# Altium PCB Main.PcbDoc (part 2 of 2)
Units mm, origin at the board's own origin, x right, y up, seen from the top; angles counter-clockwise.
Board outline 40.1 x 80 mm, 2 copper layers (Top Layer, Bottom Layer), stack 1.569 mm thick; 84 components, 82 nets, 339 pads, 242 vias.
Unrouted connection lines stored in the file: 3.
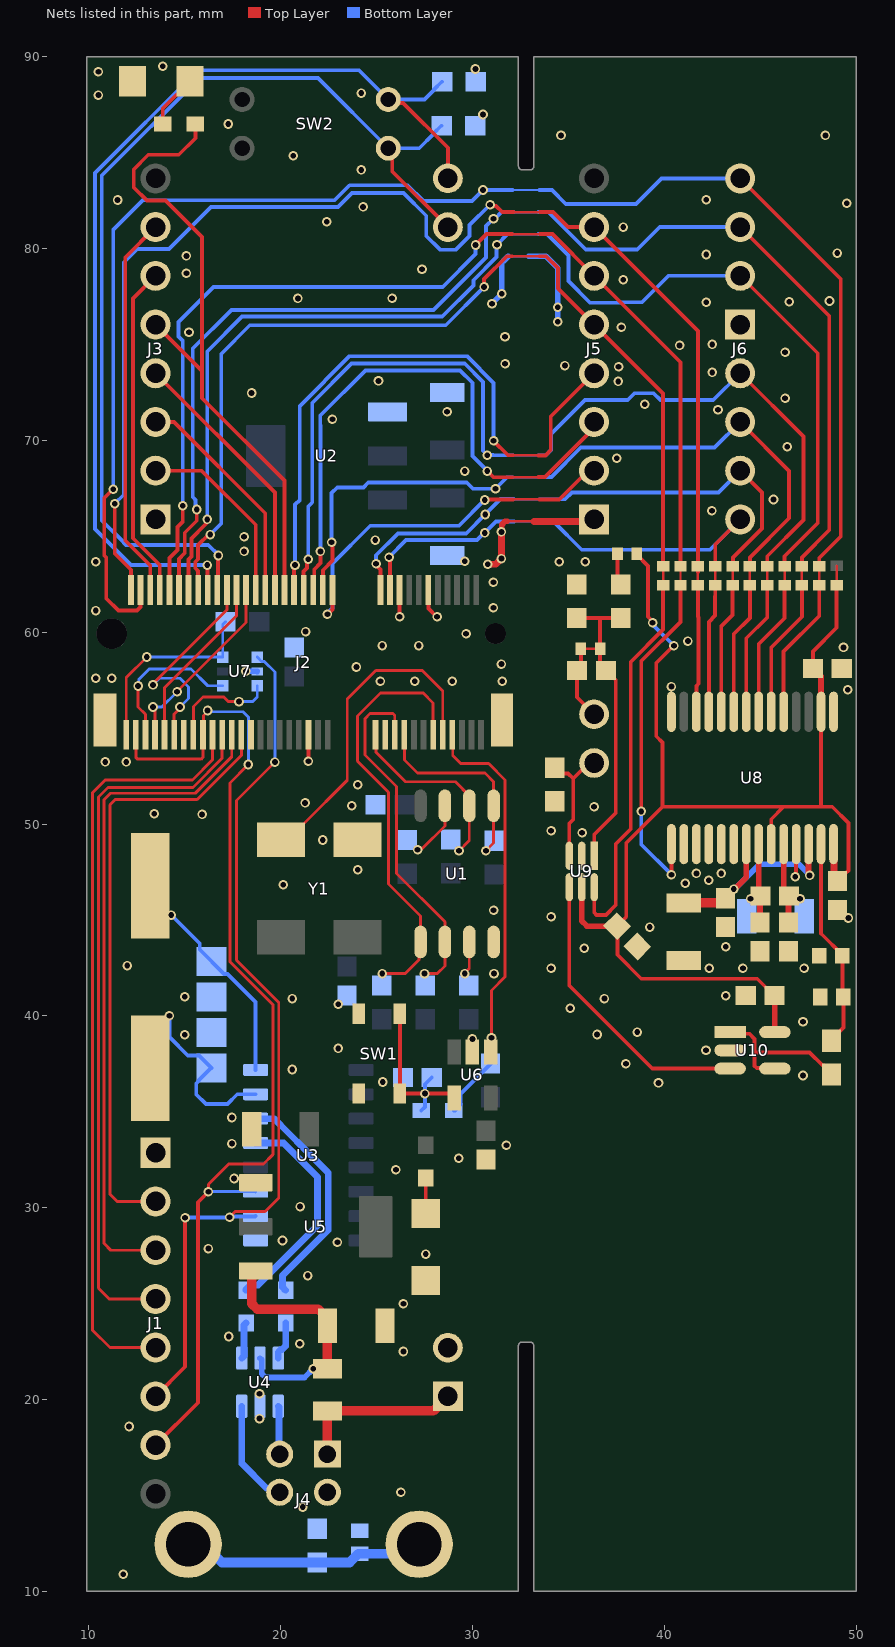
[diagram p2: the nets of this part, all layers, seen from the top]

## Via types
v1: diameter 0.5, hole 0.3, Top Layer to Bottom Layer, 242 vias

## Nets (pads, with @x,y where several pads share a name; then routed paths per layer and width w, separated by ;. In a path a pad name is that pad's centre, name@x,y a point inside that pad or via, vN(x,y) a via of type N, cw(c..) or ccw(c..) an arc to the next point about the centre after c; other vN are vias at no path point) (continued)
+3.3V_ADC: C16.2 C20.2 C21.1 C23.2 J11.2 J20.2 U8.2 U8.23 U8.28 U9.5 U10.5 | length 67.1
  Top Layer w0.2: J11.2@38.563,64.099 38.563,64.049 39.161,63.452 39.161,60.803 39.393,60.571 v1(39.393,60.49) ; v1(40.502,59.292) 40.473,59.292 39.582,58.401 39.582,54.575 39.9,54.257 39.9,50.9 ; U8.23@45.575,48.95 45.575,50.25 46.225,50.9 ; C23.2@45.752,41.054 45.727,41.054 44.846,41.935 44.33,41.935 44.328,41.933 42.123,41.933 42.121,41.935 38.8,41.935 37.554,43.182 37.554,44.658 C21.1@37.536,44.675 37.536,44.68 38.016,45.161 38.016,49.016 39.9,50.9 ; C20.2@47.75,58.1 47.75,58.994 48.985,60.229 J20.2@48.985,62.458 ; U8.2@48.175,55.85 48.175,50.9 ; C16.2@49.04,47.021 49.04,47.046 49.44,47.446 49.465,47.446 49.6,47.581 49.6,50.057 48.757,50.9 48.175,50.9 ; 39.9,50.9 46.225,50.9 ; 46.225,50.9 48.175,50.9
  Top Layer w0.3: U9.5@35.7,46.705 35.7,44.94 35.965,44.675 C21.1@36.935,44.675 ; C23.2@45.752,41.054 45.766,41.04 U10.5@45.766,39.15 ; C20.2@47.775,58.1 48.175,57.7 U8.2@48.175,55.85
  Top Layer w0.35: U8.28@48.825,48.95 48.844,48.931 48.844,47.217 C16.2@49.04,47.021
  Bottom Layer w0.2: v1(39.393,60.49) 39.393,60.409 39.733,60.069 39.733,60.062 40.502,59.293 v1(40.502,59.292)
+5V: C9.2 F1.2 U4.5 U5.3 | length 12.4
  Top Layer w0.5: U5.3@18.489,26.71 18.489,24.993 18.782,24.7 21.97,24.7 22.437,24.233 F1.2@22.437,21.604
  Bottom Layer w0.3: U4.5@18.928,22.153 19.012,22.069 19.012,21.343 19.211,21.144 21.244,21.144 v1(21.7,21.6)
+5V_USB: F1.1 J4.1 P2.1 | length 8.9
  Top Layer w0.5: J4.1@22.44,17.15 22.44,19.401 F1.1@22.437,19.404 27.964,19.404 P2.1@28.72,20.16
A: U9.4 U10.3 | length 15.3
  Top Layer w0.2: U9.4@35.05,46.705 35.05,41.576 39.376,37.25 U10.3@43.434,37.25
AIN: C24.1 R19.2 R20.2 U8.27 | length 11
  Top Layer w0.2: U8.27@48.175,48.95 48.175,44.275 48.182,44.275 49.288,43.169 R20.2@49.288,43.142 49.288,41.037 C24.1@49.339,40.985 49.339,39.392 48.718,38.771 R19.2@48.718,38.699
ANA_0: P3.1 R21.2 U9.3 | length 6.7
  Top Layer w0.2: R21.2@34.295,52.939 34.598,52.636 34.983,52.636 35.255,52.365 ; U9.3@35.05,48.345 35.05,50.028 35.255,50.233 35.255,52.365 ; P3.1@36.339,53.18 36.07,53.18 35.255,52.365
ANA_1: C22.2 J12.2 P3.2 | length 3.9
  Top Layer w0.2: J12.2@35.657,59.129 35.657,58.203 C22.2@35.454,58 35.454,56.605 P3.2@36.339,55.72
CH340_RX: J1.7 J2.59 J2.73 U3.3 | length 54.9
  Top Layer w0.15: J2.59@15.986,54.686 15.986,55.654 16.191,55.859 v1(16.191,55.917) ; v1(18.316,53.1) 17.36,52.144 17.36,42.816 19.6,40.576 19.6,39.01 19.595,39.005
  Top Layer w0.16: J2.73@12.45,54.65 12.45,53.477 12.544,53.383 15.856,53.383 15.95,53.477 J2.59@15.95,54.65 ; v1(16.234,30.827) 16.234,31.211 17.295,32.271 19.104,32.271 19.595,32.762 19.595,39.005
  Top Layer w0.2: J1.7@13.48,17.62 15.684,19.825 15.684,30.277 v1(16.234,30.827) ; J2.59@15.95,54.65 J2.59@15.986,54.686
  Bottom Layer w0.15: v1(16.191,55.917) 16.253,55.855 18.035,55.855 18.316,55.574 v1(18.316,53.1)
  Bottom Layer w0.16: v1(16.234,30.827) 16.257,30.85 18.673,30.85 U3.3@18.696,30.827
CH340_TX: J1.6 U3.2 U7.1 | length 47
  Top Layer w0.15: v1(17.34,29.501) 17.633,29.794 19.194,29.794 19.9,30.5 19.9,40.7 17.7,42.9 17.7,51.23 v1(19.7,53.23)
  Top Layer w0.2: J1.6@13.48,20.16 15.021,21.701 v1@15.021,29.469
  Bottom Layer w0.15: U7.1@18.783,58.705 19.008,58.48 19.147,58.48 19.705,57.922 19.705,53.235 v1(19.7,53.23)
  Bottom Layer w0.2: v1(15.02,29.47) 15.035,29.485 17.324,29.485 17.368,29.529 18.667,29.529 U3.2@18.696,29.557
CLK: J2.9 Y1.3 | length 16.4
  Top Layer w0.15: Y1.3@20.727,49.7 20.727,49.778 20.977,49.778 21.191,49.992 21.191,49.998 23.475,52.282 23.475,56.512 24.963,58 27.387,58 28.45,56.937 J2.9@28.45,54.65
CS: J1.4 J2.55 | length 37.3
  Top Layer w0.15: J1.4@13.48,25.24 11.06,25.24 10.5,25.8 10.5,51.4 11,51.9 15.424,51.9 16.95,53.426 J2.55@16.95,54.65
D2: J15.2 U8.5 | length 7.4
  Top Layer w0.2: U8.5@46.225,55.85 46.225,58.988 48.079,60.842 48.079,61.5 48.081,61.503 J15.2@48.081,62.439
D3: J7.2 U8.6 | length 7.3
  Top Layer w0.2: U8.6@45.575,55.85 45.575,59.206 47.174,60.805 47.174,62.436 J7.2@47.177,62.439
D4: J17.2 U8.7 | length 7.1
  Top Layer w0.2: U8.7@44.925,55.85 44.925,59.381 46.273,60.728 J17.2@46.273,62.439
D5: J14.2 U8.8 | length 7
  Top Layer w0.2: U8.8@44.275,55.85 44.275,59.68 45.366,60.771 45.366,62.436 J14.2@45.368,62.439
D6: J16.2 U8.9 | length 6.9
  Top Layer w0.2: U8.9@43.625,55.85 43.625,59.904 44.464,60.743 J16.2@44.464,62.439
D7: J18.2 U8.10 | length 6.8
  Top Layer w0.2: U8.10@42.975,55.85 42.975,60.322 43.557,60.904 43.557,61.818 43.56,61.82 J18.2@43.56,62.439
D8: J19.2 U8.11 | length 6.7
  Top Layer w0.2: U8.11@42.325,55.85 42.325,60.536 42.65,60.861 42.65,61.864 42.656,61.869 J19.2@42.656,62.439
D9: J8.2 U8.12 | length 6.6
  Top Layer w0.2: U8.12@41.675,55.85 41.675,57.2 41.784,57.309 41.784,60.769 41.751,60.802 J8.2@41.751,62.439
GND: C1.1 C2.1 C3.1 C4.2 C5.1 C6.1 C7.1 C8.2 C9.1 C10.2 C11.1 C12.2 C13.2 C14.1 C16.1 C18.1 C19.1 C20.1 C21.2 C23.1 C24.2 D1.1 D2.1 J1.1 J2.12 J2.18 J2.37 J2.76 J2.77 J3.8 J4.4 J5.8 J6.4 P2.2 R11.1 R16.1 R17.1 R18.1 R20.1 R21.1 SW1.1 SW1.2 U1.4 U2.1 U3.1 U4.2 U5.1 U6.2 U7.2 U8.1 U8.14 U8.16 U8.17 U8.18 U8.19 U8.20 U8.25 U9.2 U10.2 Y1.2 | length 22.7
  Top Layer w0.127: 31.82,65.782 33.202,65.782 33.209,65.775
  Top Layer w0.2: v1(21.45,53.275) J2.37@21.45,54.65 ; v1(26.2,60.811) J2.18@26.2,62.2 ; J2.12@27.7,62.2 27.7,61.238 28.131,60.807 v1(28.155,60.807) ; v1(46.825,47.246) 46.875,47.296 U8.25@46.875,48.95
  Top Layer w0.3: v1(31.51,65.228) 31.522,65.24 31.522,65.606 31.698,65.782 31.82,65.782
  Top Layer w0.35: v1(30.801,63.537) 31.209,63.537 v1(31.51,63.838) v1(31.51,65.228) ; 33.209,65.775 36.234,65.775 J5.8@36.34,65.88
  Bottom Layer w0.127: 31.866,79.601 32.929,79.601
  Bottom Layer w0.3: v1(18.19,57.97) 18.197,57.963 18.775,57.963 U7.2@18.783,57.955 ; v1(31.018,77.125) 31.018,77.13 31.521,77.633 31.521,79.249 31.659,79.387 31.659,79.395 31.866,79.601 ; 32.929,79.601 33.833,79.601 34.452,78.982 v1(34.452,76.181)
  other v1: 11.8,10.89 21.15,14.393 26.268,15.16 12.1,18.586 18.9,19 18.9,20.3 26.4,22.5 21,22.9 17.3,23.283 26.4,24.987 21.415,26.457 27.566,27.579 16.234,27.864 22.96,28.195 20.095,28.287 21.015,30.053 17.574,31.52 26.009,31.975 29.29,32.57 31.772,33.252 17.458,33.34 17.458,34.7 39.7,36.5 25.32,36.55 47.232,36.889 20.6,37.2 38,37.5 42.175,38.2 23,38.3 30,38.79 15,39.01 36.5,39.024 38.597,39.15 47.232,39.695 35.1,40.4 23,40.6 20.6,40.9 36.881,40.9 15,41 43.2,41.04 31.125,42.2 34.1,42.485 42.351,42.483 44.1,42.483 47.291,42.483 12.006,42.618 35.827,43.525 43.2,43.6 39.237,44.627 49.6,45.1 34.1,45.161 31.1,45.5 20.138,46.83 41.1,46.906 42.325,47.074 41.675,47.424 42.975,47.424 24.016,47.615 22.191,49.167 35.714,49.54 34.1,49.652 15.906,50.499 13.406,50.539 36.339,50.9 23.712,50.95 21.272,51.1 24.016,52.044 10.857,53.236 11.95,53.236 49.564,57 40.375,57.163 25.201,57.437 26.995,57.437 28.95,57.437 31.55,57.437 10.357,57.6 11.2,57.6 23.949,58.185 31.51,58.335 49.346,59.206 25.296,59.303 27.2,59.303 41.234,59.535 29.67,59.925 21.3,60.03 10.357,61.125 31.094,61.278 31.094,62.6 10.357,63.675 34.525,63.671 35.886,63.671 29.6,63.7 18.095,64.212 24.926,64.8 18.095,64.98 42.484,66.326 45.694,66.917 29.6,68.4 37.519,69.064 46.417,69.665 22.7,71.1 28.679,71.487 42.8,71.597 38.982,71.88 46.3,72.2 18.486,72.47 37.601,73.074 25.1,73.1 42.5,73.546 37.618,73.838 34.822,73.9 31.7,74 46.3,74.6 40.797,74.952 42.5,75.003 31.696,75.403 15.223,75.64 37.765,75.903 34.452,76.947 42.192,77.202 46.517,77.229 48.617,77.265 20.9,77.4 25.812,77.412 31.522,77.639 37.863,78.38 15.085,78.717 27.368,78.917 15.085,79.617 42.192,79.692 49.017,79.765 37.863,81.12 22.4,81.393 24.298,82.173 49.517,82.365 11.5,82.533 42.192,82.546 24.2,84.1 20.656,84.84 34.618,85.9 48.4,85.9 17.267,86.496 30.55,86.99 10.5,88 24.2,88.106 10.5,89.22 30.153,89.36 13.853,89.5
GO: J9.2 U8.15 | length 18.2
  Top Layer w0.2: v1(38.8,50.656) 38.8,58.495 40.838,60.533 40.838,61.857 40.847,61.866 J9.2@40.847,62.439 ; v1(40.375,47.359) U8.15@40.375,48.95
  Bottom Layer w0.2: v1(38.8,50.656) 38.8,48.934 v1(40.375,47.359)
gpio: J2.21
IO0: J2.49
IO7: J2.63
IO14: J2.74 J5.2 J8.1 | length 67.5
  Top Layer w0.127: 32.15,81.9 33.512,81.9
  Top Layer w0.2: v1(11.35,66.7) 11.35,64.104 12.2,63.254 J2.74@12.2,62.2 ; v1(30.92,82.288) 31.002,82.288 31.07,82.22 31.231,82.22 31.551,81.9 32.15,81.9 ; 33.512,81.9 34.2,81.9 34.98,81.12 J5.2@36.34,81.12 41.751,75.708 J8.1@41.751,63.439 41.751,63.123
  Bottom Layer w0.2: v1(11.35,66.7) 11.819,67.169 11.819,79.281 12.521,79.983 14.183,79.983 16.373,82.173 22.999,82.173 23.726,82.9 26.4,82.9 27.591,81.709 27.591,80.652 28.301,79.942 29.139,79.942 29.849,80.652 29.849,81.228 30.909,82.288 v1(30.92,82.288)
IO15: J2.72 J6.1 J15.1 | length 80.5
  Top Layer w0.2: v1(11.269,67.454) 10.8,66.985 10.8,64.009 10.907,63.903 10.907,61.761 11.542,61.125 12.508,61.125 12.7,61.317 J2.72@12.7,62.2 ; J6.1@43.96,83.66 49.2,78.42 49.2,64.995 48.081,63.876 J15.1@48.081,63.439
  Bottom Layer w0.127: 32.101,83.052 33.479,83.052
  Bottom Layer w0.2: v1(11.269,67.454) 11.269,80.969 12.833,82.533 12.999,82.533 13.009,82.523 22.822,82.523 23.599,83.3 26.63,83.3 27.447,82.483 29.98,82.483 v1@30.607,83.11 ; v1(30.55,83.052) 32.101,83.052 ; 33.483,83.048 34.141,83.048 34.861,82.328 38.528,82.328 39.86,83.66 J6.1@43.96,83.66
IO16: J2.70 J3.2 | length 20.1
  Top Layer w0.2: J2.70@13.2,62.2 13.2,63.478 11.9,64.778 11.9,79.54 J3.2@13.48,81.12
IO17: J2.68 J3.3 | length 17.4
  Top Layer w0.2: J3.3@13.48,78.58 12.3,77.401 12.3,64.9 13.7,63.5 J2.68@13.7,62.2
IO18: J2.66 J5.3 J9.1 | length 56.1
  Top Layer w0.127: 32.059,80.752 33.495,80.752 33.504,80.762
  Top Layer w0.2: J2.66@14.2,62.2 14.2,63.869 14.617,64.285 14.617,65.487 14.901,65.771 v1(14.901,66.598) ; v1(30.161,80.187) 30.727,80.752 32.059,80.752 ; 33.512,80.753 34.166,80.753 J5.3@36.34,78.58 40.847,74.072 J9.1@40.847,63.439
  Bottom Layer w0.2: v1(14.901,66.598) 14.901,75.184 14.673,75.412 14.673,75.868 14.676,75.87 14.676,76.176 16.499,78 28.449,78 30.161,79.712 v1(30.161,80.187)
IO19: J2.64 J6.2 J7.1 | length 67
  Top Layer w0.2: J2.64@14.7,62.2 14.7,63.821 15,64.121 15,65.185 15.627,65.812 v1(15.627,66.396) ; J6.2@43.96,81.12 48.6,76.48 48.6,65.32 47.177,63.896 J7.1@47.177,63.439
  Bottom Layer w0.127: 32.141,81.9 33.431,81.9
  Bottom Layer w0.2: v1(15.627,66.396) 15.57,66.453 15.57,66.892 15.416,67.046 15.416,74.786 17.43,76.8 27.97,76.8 30.711,79.541 30.711,81.17 v1(31.096,81.555) 31.177,81.555 31.522,81.9 32.141,81.9 ; 33.431,81.9 33.952,81.9 35.203,80.649 35.905,79.947 38.589,79.947 39.762,81.12 J6.2@43.96,81.12
IO20: J2.62 J6.3 J17.1 | length 64.1
  Top Layer w0.2: J2.62@15.2,62.2 15.2,63.796 15.35,63.946 15.35,64.887 16.071,65.608 16.12,65.657 16.12,65.823 v1(16.177,65.88) ; J6.3@43.96,78.58 48,74.54 48,65.689 46.273,63.962 J17.1@46.273,63.439
  Bottom Layer w0.127: 32.063,80.752 33.435,80.752
  Bottom Layer w0.2: v1(16.177,65.88) 16.177,74.642 17.985,76.45 28.428,76.45 30.057,78.079 30.057,78.351 31.259,79.552 31.259,80.181 v1(31.28,80.202) 31.83,80.752 32.063,80.752 ; 33.435,80.752 33.894,80.752 35,79.647 35,78.312 36.135,77.177 37.737,77.177 37.763,77.202 38.842,77.202 40.22,78.58 J6.3@43.96,78.58
IO21: J2.60 J5.4 J10.1 | length 51
  Top Layer w0.127: 32.059,79.6 33.484,79.6
  Top Layer w0.2: J2.60@15.7,62.2 15.7,63.199 15.55,63.349 15.55,63.651 15.7,63.801 15.7,64.54 16.25,65.09 v1(16.331,65.09) ; v1(30.607,78) 30.607,78.407 31.8,79.6 32.059,79.6 ; 33.484,79.6 33.836,79.6 34.452,78.984 34.452,77.927 39.943,72.437 J10.1@39.943,63.439
  Bottom Layer w0.2: v1(16.331,65.09) 16.9,65.659 16.9,74.509 18.391,76 28.607,76 v1(30.607,78)
IO27: J2.48 J3.7 | length 9.8
  Top Layer w0.2: J3.7@13.48,68.42 15.88,68.42 18.7,65.6 J2.48@18.7,62.2
IO28: J2.46 J3.6 | length 11.7
  Top Layer w0.2: J3.6@13.48,70.96 13.485,70.955 14.445,70.955 19.2,66.2 J2.46@19.2,62.2
IO29: J2.44 J3.5 | length 13.9
  Top Layer w0.2: J3.5@13.48,73.5 19.7,67.28 J2.44@19.7,62.2
IO30: J2.42 J3.4 R1.2 | length 33.8
  Top Layer w0.2: J3.4@13.48,76.04 15.9,73.619 ; R1.2@15.553,86.496 15.553,85.753 14.688,84.888 13.1,84.888 12.343,84.131 12.343,83.189 13.032,82.5 14,82.5 15.9,80.6 15.9,73.619 ; J2.42@20.2,62.2 20.2,67.9 15.9,72.2 15.9,73.619
IO31: J2.40 J5.5 | length 32.8
  Top Layer w0.127: 32.125,69.225 33.442,69.225
  Top Layer w0.2: J2.40@20.7,62.2 20.7,63.45 v1(20.75,63.5) ; v1(31.1,69.976) 31.854,69.223 32.123,69.223 ; 33.45,69.217 33.8,69.217 34.082,69.499 34.082,71.243 J5.5@36.34,73.5
  Bottom Layer w0.2: v1(20.75,63.5) 20.75,66.65 21,66.9 21,71.8 23.59,74.39 29.71,74.39 31.1,73 v1(31.1,69.976)
IO32: J2.38 J6.5 J14.1 | length 51.9
  Top Layer w0.2: J2.38@21.2,62.2 21.2,63.172 21.382,63.354 21.382,63.749 v1(21.439,63.806) ; J6.5@43.96,73.5 47.252,70.208 47.252,65.848 45.366,63.962 45.366,63.441 J14.1@45.368,63.439
  Bottom Layer w0.127: 32.112,69.225 33.428,69.225
  Bottom Layer w0.2: v1(21.439,63.806) 21.439,66.56 21.65,66.771 21.65,71.955 23.695,74 29.6,74 30.55,73.05 30.55,69.456 v1(30.777,69.229) 31.069,69.229 31.073,69.225 32.112,69.225 ; 33.428,69.225 33.825,69.225 34.1,69.5 34.1,70.328 35.869,72.097 38.097,72.097 38.455,72.455 39.442,72.455 39.8,72.097 42.557,72.097 J6.5@43.96,73.5
IO33: J2.36 J5.6 | length 30.4
  Top Layer w0.127: 32.092,68.081 33.434,68.081
  Top Layer w0.2: J2.36@21.7,62.2 21.75,62.25 21.75,63.275 22.074,63.599 v1(22.074,64.212) ; v1(30.777,68.4) 31.096,68.081 32.092,68.081 ; 33.435,68.082 33.784,68.082 36.34,70.637 J5.6@36.335,70.96
  Bottom Layer w0.2: v1(22.074,64.212) 22.074,70.774 22.062,70.787 22.062,71.29 24.422,73.65 25.072,73.65 25.528,73.65 29.353,73.65 30,73.003 30,69.177 v1(30.777,68.4)
IO34: J2.34 J6.6 J16.1 | length 37.8
  Top Layer w0.2: J2.34@22.2,62.2 22.2,63.23 22.7,63.73 22.7,64.648 v1(22.654,64.694) ; J6.6@43.96,70.96 46.509,68.411 46.509,65.944 44.464,63.899 J16.1@44.464,63.439
  Bottom Layer w0.127: 32.087,68.08 33.433,68.08 33.448,68.095 33.5,68.095
  Bottom Layer w0.2: v1(22.654,64.694) 22.654,67.254 22.949,67.549 24.317,67.549 24.568,67.8 29.703,67.8 30.029,67.475 v1(31.2,67.475) 31.806,68.08 32.087,68.08 ; 33.5,68.095 34.117,68.095 35.645,69.623 42.622,69.623 J6.6@43.96,70.96
IO35: J2.32 J5.7 | length 19.9
  Top Layer w0.127: 32.125,66.925 33.479,66.925
  Top Layer w0.2: v1(22.44,60.929) 22.447,60.929 22.703,61.185 22.703,62.197 J2.32@22.7,62.2 ; v1(30.637,66.89) 30.672,66.925 32.125,66.925 ; 33.479,66.925 34.525,66.925 36.01,68.41 J5.7@36.41,68.41
  Bottom Layer w0.2: v1(22.44,60.929) 22.44,61.01 22.696,61.266 22.696,63.574 24.672,65.55 29.298,65.55 v1(30.637,66.89)
IO36: J2.22 J6.7 J18.1 | length 28.7
  Top Layer w0.2: v1(24.978,63.57) 24.978,63.497 25.2,63.275 J2.22@25.2,62.2 ; J18.1@43.56,63.439 43.584,63.463 43.584,63.896 45.097,65.409 45.097,67.283 J6.7@43.96,68.42
  Bottom Layer w0.127: 32.165,66.932 33.48,66.932 33.483,66.929
  Bottom Layer w0.2: v1(24.978,63.57) 24.978,64.013 26.115,65.15 29.675,65.15 v1(30.661,66.136) ; v1@30.709,66.184 31.466,66.94 32.157,66.94 ; 33.483,66.929 34.829,66.929 35.183,67.283 42.823,67.283 J6.7@43.96,68.42
IO37: J2.20 J6.8 J19.1 | length 25.3
  Top Layer w0.2: v1(25.652,63.909) 25.7,63.861 J2.20@25.7,62.2 ; J19.1@42.656,63.222 42.656,63.494 42.657,63.495 42.657,64.577 J6.8@43.96,65.88
  Bottom Layer w0.127: 32.168,65.778 33.475,65.778
  Bottom Layer w0.2: v1(25.652,63.909) 26.543,64.8 30.234,64.8 30.609,65.175 v1(30.637,65.175) 30.637,65.18 31.235,65.778 32.168,65.778 ; 33.479,65.775 34.225,65.775 35.7,64.3 42.38,64.3 J6.8@43.96,65.88
NetC4_1: C4.1 J4.5 J4.6 R11.2 | length 12.8
  Bottom Layer w0.5: J4.5@15.18,12.45 15.995,12.45 16.945,11.5 23.595,11.5 24.055,11.96 26.73,11.96 J4.6@27.22,12.45
NetC8_1: C8.1 U3.7 Y2.2 | length 9.2
  Bottom Layer w0.2: v1(14.2,40) 14.2,38.887 15.158,37.929 15.75,37.929 C8.1@16.4,37.279 16.375,37.279 15.725,36.629 15.725,36.604 15.6,36.479 15.6,35.9 16.1,35.4 16.646,35.4 16.65,35.396 17.15,35.396 17.154,35.4 17.233,35.4 17.741,35.907 U3.7@18.696,35.907
NetC10_1: C10.1 U3.8 Y2.1 | length 10
  Bottom Layer w0.2: v1(14.3,45.25) 15.785,43.766 15.785,43.448 17.05,42.183 17.226,42.183 18.696,40.713 U3.8@18.696,37.177
NetC12_1: C12.1 R14.1 SW1.3 SW1.4 U6.4 | length 9
  Top Layer w0.2: SW1.3@26.215,35.945 v1(27.52,35.945) 28.825,35.945 U6.4@29.05,35.72 ; SW1.3@26.215,35.955 SW1.4@26.215,40.105
  Bottom Layer w0.2: R14.1@27.332,35.065 27.52,35.253 v1(27.52,35.945) 27.52,36.43 C12.1@27.88,36.79
NetC13_1: C13.1 C19.2 U8.21 U8.26 | length 11.4
  Top Layer w0.2: v1(43.625,46.605) C13.1@43.671,46.605
  Top Layer w0.3: C13.1@43.671,46.605 44.275,47.209 U8.21@44.275,48.95 ; U8.26@47.525,48.95 47.525,47.422 47.576,47.372 v1(47.576,47.318)
  Top Layer w0.5: C19.2@41.021,45.887 42.95,45.887 43.2,46.137 C13.1@43.2,46.18
  Bottom Layer w0.2: v1(43.625,46.605) v1@43.674,46.605
  Bottom Layer w0.3: v1@43.674,46.605 44.969,47.9 47.02,47.9 47.576,47.344 v1(47.576,47.318)
NetC14_2: C14.2 C15.2 C17.2 U8.24 | length 4.2
  Top Layer w0.3: U8.24@46.225,48.95 46.225,46.529 C17.2@46.512,46.242 46.478,46.209 C14.2@46.478,44.863
  other v1: 47.08,46.108
NetC15_1: C15.1 C17.1 C18.2 U8.22 | length 4.1
  Top Layer w0.3: U8.22@44.925,48.95 44.925,46.329 C17.1@45.012,46.242 44.99,46.22 C18.2@44.99,44.863
  other v1: 44.5,46.108
NetC22_1: C22.1 J12.1 R15.1 R18.2 U9.1 | length 15.5
  Top Layer w0.2: R18.2@35.439,60.738 36.585,60.738 ; U9.1@36.35,48.345 36.35,49.45 37.468,50.568 37.468,57.511 36.979,58 C22.1@36.954,58 36.654,58.3 36.654,59.129 36.654,60.669 36.585,60.738 ; R15.1@37.731,60.738 36.585,60.738
NetD1_2: D1.2 R1.1 | length 2.9
  Top Layer w0.2: R1.1@13.853,86.496 13.853,87.295 14.583,88.025 14.683,88.025 15.283,88.625 D1.2@15.283,88.725
NetD2_2: D2.2 R12.2 | length 1.9
  Top Layer w0.2: D2.2@27.566,29.695 R12.2@27.566,31.549
NetJ11_1: J11.1 R15.2 | length 1.7
  Top Layer w0.2: J11.1@37.563,64.099 37.563,62.658 R15.2@37.731,62.491
NetR5_2: R5.2 U1.7 | length 3
  Top Layer w0.15: v1(27.138,48.654) 27.205,48.721 27.386,48.721 28.565,49.9 U1.7@28.565,50.95
NetR6_2: R6.2 U1.3 | length 1.7
  Top Layer w0.15: v1(29.6,42.2) 29.6,42.228 29.835,42.463 U1.3@29.835,43.85
NetR9_2: R9.2 U4.6 | length 2
  Bottom Layer w0.35: U4.6@19.878,22.153 19.878,22.463 19.998,22.583 20.056,22.583 20.261,22.788 R9.2@20.261,23.987
NetR10_2: R10.2 U4.4 | length 1.9
  Bottom Layer w0.35: U4.4@17.978,22.153 18.089,22.264 18.089,23.876 R10.2@18.2,23.987
NetR19_1: R19.1 U10.1 U10.4 | length 8.5
  Top Layer w0.2: U10.1@43.434,39.15 43.52,39.064 44.436,39.064 44.702,38.798 44.702,38.095 ; U10.4@45.766,37.25 45.742,37.274 44.819,37.274 44.702,37.391 44.702,38.095 ; R19.1@48.718,36.949 48.718,37.02 48.312,37.427 48.24,37.427 47.572,38.095 44.702,38.095
P11: J2.11 R3.1 U1.1 | length 22.6
  Top Layer w0.15: v1(25.3,42.2) 26.495,42.2 27.219,42.924 27.219,43.774 U1.1@27.295,43.85 27.295,45.205 25.624,46.876 25.624,51.651 24,53.275 24,55.624 25.201,56.825 27.437,56.825 27.95,56.312 J2.11@27.95,54.65
P17: J2.17 R8.2 U1.5 | length 10.2
  Top Layer w0.15: J2.17@26.45,54.65 26.45,53.341 27.138,52.653 30.652,52.653 31.105,52.2 U1.5@31.105,50.95 31.105,49.005 v1(30.7,48.6)
P19: J2.19 R7.2 U1.2 | length 18.6
  Top Layer w0.15: J2.19@25.95,54.65 25.95,55.658 25.854,55.754 24.664,55.754 24.4,55.49 24.4,53.6 26.038,51.962 26.038,47.427 28.565,44.9 U1.2@28.565,43.85 28.565,42.6 28.165,42.2 v1(27.5,42.2)
P23: J2.23 R4.1 U1.6 | length 9.8
  Top Layer w0.15: J2.23@24.95,54.65 24.971,54.629 24.971,53.739 26.51,52.2 29.11,52.2 29.835,51.475 U1.6@29.835,50.95 29.835,49.135 v1(29.3,48.6)
PGM_SEL_0: J2.52 J2.67 | length 9.1
  Top Layer w0.15: J2.67@13.95,54.65 13.95,57.104 17.7,60.854 J2.52@17.7,62.2
PGM_SEL_1: J2.50 J2.69 | length 9.9
  Top Layer w0.15: v1(13.346,56.1) 13.346,56.019 13.45,55.915 J2.69@13.45,54.65 ; v1(14.6,56.9) 18.2,60.5 J2.50@18.2,62.2
  Bottom Layer w0.15: v1(13.346,56.1) 13.8,56.1 v1@14.563,56.863
  Bottom Layer w0.2: v1@14.563,56.863 v1(14.6,56.9)
PGM_SEL_SW_0: J2.58 P1.2 R17.2 SW2.2 | length 53.6
  Top Layer w0.2: v1(16.177,63.5) 16.189,63.488 16.189,62.212 J2.58@16.2,62.2 ; SW2.2@25.61,87.77 25.782,87.598 26.381,87.598 28.72,85.259 P1.2@28.72,83.66
  Bottom Layer w0.2: v1(16.177,63.5) 12.2,63.5 10.326,65.374 10.326,83.947 15.679,89.3 24.08,89.3 SW2.2@25.61,87.77 27.493,87.77 27.994,88.271 27.994,88.294 28.4,88.7 R17.2@28.423,88.7
PGM_SEL_SW_1: J2.56 P1.1 R16.2 SW2.1 | length 53.9
  Top Layer w0.2: J2.56@16.7,62.2 16.727,62.227 16.727,63.973 v1(16.754,64) ; SW2.1@25.61,85.23 25.82,85.02 25.82,84.02 P1.1@28.72,81.12
  Bottom Layer w0.2: v1(16.754,64) 16.754,64.024 16.228,64.55 11.945,64.55 11.645,64.85 10.676,65.819 10.676,83.802 15.774,88.9 21.94,88.9 SW2.1@25.61,85.23 27.23,85.23 27.971,85.971 27.971,85.994 28.377,86.4 R16.2@28.4,86.4
RV_RST: J2.7 R13.2 R14.2 U6.1 | length 23.9
  Top Layer w0.15: J2.7@28.95,54.65 28.971,54.629 28.971,53.567 29.388,53.15 30.845,53.15 31.705,52.29 31.705,42.038 30.995,41.328 U6.1@30.995,38.625 ; U6.1@30.95,38.12 30.95,38.225 31.085,38.36 31.085,38.535 U6.1@30.995,38.625 ; U6.1@31.12,38.5 31.05,38.5 30.995,38.445 U6.1@30.995,38.625
  Bottom Layer w0.15: R13.2@30.942,37.511 30.995,37.564 v1(30.995,38.853)
  Bottom Layer w0.2: R14.2@29.032,35.065 29.082,35.065 29.382,35.365 29.382,35.927 30.942,37.487 R13.2@30.942,37.511
RV_TX: J2.61 U7.3 | length 5.8
  Top Layer w0.15: J2.61@15.45,54.65 15.45,56.12 15.95,56.62 17.031,56.62 17.271,56.38 v1(17.83,56.38)
  Bottom Layer w0.15: v1(17.83,56.38) 18.544,56.38 18.783,56.619 U7.3@18.783,57.205
SCK: J1.5 J2.57 | length 40
  Top Layer w0.15: J1.5@13.48,22.7 11.1,22.7 10.2,23.6 10.2,51.643 10.857,52.3 15.4,52.3 16.45,53.35 J2.57@16.45,54.65
SDI: J1.3 J2.53 | length 34.7
  Top Layer w0.15: J1.3@13.48,27.78 11.144,27.78 10.8,28.124 10.8,51.276 11.124,51.6 15.549,51.6 17.45,53.501 J2.53@17.45,54.65
SDO: J1.2 J2.51 | length 31.8
  Top Layer w0.15: J1.2@13.479,30.32 11.48,30.32 11.1,30.7 11.1,51 11.376,51.276 15.649,51.276 17.95,53.577 J2.51@17.95,54.65
SELECT: J10.2 U9.6 | length 20.4
  Top Layer w0.2: U9.6@36.35,46.705 36.35,45.378 36.467,45.261 36.955,45.261 37.468,45.775 37.468,48.963 38.25,49.745 38.25,58.44 39.943,60.133 J10.2@39.943,62.439
TX_SEL: J2.75 R2.1 U7.6 | length 10.4
  Top Layer w0.15: J2.75@11.95,54.65 11.95,57.63 v1(13.025,58.705)
  Bottom Layer w0.15: v1(13.025,58.705) U7.6@16.983,58.705 16.983,60.404 R2.1@17.125,60.547
USB_1_N: J4.2 U4.1 | length 2.5
  Bottom Layer w0.35: U4.1@19.878,19.643 19.914,19.607 19.914,17.186 J4.2@19.95,17.15
USB_1_P: J4.3 U4.3 | length 5.6
  Bottom Layer w0.35: U4.3@17.978,19.643 17.978,16.659 19.274,15.363 19.747,15.363 J4.3@19.95,15.16
USB_2_N: R9.1 U3.6 | length 12.1
  Bottom Layer w0.35: U3.6@18.696,34.637 19.663,34.637 20.399,33.901 21.243,33.057 22.475,31.825 22.475,28.837 20.095,26.457 20.095,25.853 R9.1@20.261,25.687
USB_2_P: R10.1 U3.5 | length 11.6
  Bottom Layer w0.35: R10.1@18.2,25.687 18.2,25.734 18.425,25.959 18.819,25.959 21.925,29.065 21.925,31.597 21.015,32.507 20.155,33.367 U3.5@18.696,33.367
VSCPU_RST: J2.54 J2.65 | length 11.6
  Top Layer w0.15: v1@13.346,57.313 17.2,61.167 J2.54@17.2,62.2 ; J2.65@14.45,54.65 14.45,55.732 14.754,56.037 v1(14.754,56.1)
  Top Layer w0.2: v1(13.346,57.25) v1@13.346,57.313
  Bottom Layer w0.15: v1@13.346,57.276 13.67,57.6 14.754,57.6 15.204,57.15 15.204,56.55 v1(14.754,56.1)
  Bottom Layer w0.2: v1(13.346,57.25) v1@13.346,57.276
VSCPU_RX: J2.71 U7.4 | length 8
  Top Layer w0.15: v1(12.57,57.193) 12.57,56.098 12.95,55.718 J2.71@12.95,54.65
  Bottom Layer w0.15: v1@12.605,57.228 12.605,57.535 13.152,58.082 15.323,58.082 16.2,57.205 U7.4@16.983,57.205
  Bottom Layer w0.2: v1(12.57,57.193) v1@12.605,57.228
pads on no net: J2. J2.2 J2.4 J2.6 J2.8 J2.10 J2.39 J2.41 J2.43 J2.45 J2.47 U3.9 U3.10 U3.11 U3.12 U3.13 U3.14 U3.15 U6.3 U8.3 U8.4 U8.13

## Polygon pours and split planes (outlines as drawn)
GND on Bottom Layer "NONET_L-01_P-001" (solid, remove dead copper, pour order 5): 33.2,86.6 33.2,84.692 33.9,84.692 33.9,77.95 33.2,77.95 33.2,70.959 33.896,70.959 33.899,70.957 33.899,64.491 33.202,64.491 33.202,36.1 50,36.1 50,86.6
GND on Bottom Layer "NONET_L-01_P-001" (solid, remove dead copper, pour order 1): 9.9,10 32.4,10 32.4,64.061 29.752,64.061 29.752,70.959 32.4,70.959 32.4,71.104 32.4,77.95 29.752,77.95 29.752,84.66 32.4,84.66 32.4,90 9.9,90
GND on Top Layer "NONET_L-01_P-001" (solid, remove dead copper, pour order 6): 33.2,86.6 33.2,84.692 33.9,84.692 33.9,77.95 33.2,77.95 33.2,70.959 33.896,70.959 33.899,70.957 33.899,64.491 33.202,64.491 33.202,36.1 50,36.1 50,86.6
GND on Top Layer "NONET_L-01_P-001" (solid, remove dead copper, pour order 3): 9.9,10 32.4,10 32.4,64.061 29.74,64.061 29.74,70.959 32.4,70.959 32.4,71.104 32.4,77.95 29.74,77.95 29.74,84.66 32.4,84.66 32.4,90 9.9,90

## Keep-outs
Top Layer:
  region: 24.15,63.25 24.171,63.229 24.963,63.229 24.963,61.28 24.964,61.278 26.995,61.278 26.995,60.344 26.951,60.28 24.163,60.28

## Silkscreen, mask and mechanical layers (free items; w line width, h text height)
Top Overlay:
  drawing of 27 lines, arcs and shapes, not listed
  text "SW_0" at 31.746,88.906 h1.2 r180
  text "SW_1" at 31.684,86.536 h1.2 r180
  text "1" at 10.654,84.046 h1.2 r270
  text "3V3" at 38.154,82.974 h1.2
  text "IO15" at 45.154,82.914 h1.2
  text "2" at 10.668,81.829 h1.2 r270
  text "IO14" at 38.154,80.447 h1.2
  text "IO19" at 45.154,80.387 h1.2
  text "3" at 10.668,79.213 h1.2 r270
  text "IO18" at 38.154,77.92 h1.2
  text "IO20" at 45.154,77.86 h1.2
  text "4" at 10.668,76.596 h1.2 r270
  text "IO21" at 38.154,75.392 h1.2
  text "GND" at 45.154,75.332 h1.2
  text "5" at 10.668,73.979 h1.2 r270
  text "IO31" at 38.154,72.865 h1.2
  text "IO32" at 45.154,72.805 h1.2
  text "6" at 10.668,71.363 h1.2 r270
  text "IO33" at 38.205,70.484 h1.2
  text "IO34" at 45.154,70.278 h1.2
  text "7" at 10.668,68.746 h1.2 r270
  text "IO35" at 38.154,67.811 h1.2
  text "IO36" at 45.154,67.751 h1.2
  text "e" at 15.309,67.1 h18
  text "8" at 10.668,66.13 h1.2 r270
  text "GND" at 38.154,65.284 h1.2
  text "IO37" at 45.154,65.224 h1.2
  text "ADC  / Jumpers" at 38.3,57.3 h1.2
  text "A1" at 38.795,55.015 h1.2 r90
  text "A0" at 38.746,51.954 h1.2 r90
  text "RST" at 27.054,41.516 h1.2 r270
  text "9" at 10.654,33.346 h1.2 r270
  text "10" at 10.654,31.56 h1.2 r270
  text "PWR" at 28.954,29.346 h1.2 r270
  text "11" at 10.654,28.774 h1.2 r270
  text "12" at 10.654,26.389 h1.2 r270
  text "13" at 10.654,23.603 h1.2 r270
  text "18" at 31.336,21.8 h1.2 r90
  text "14" at 10.654,20.817 h1.2 r270
  text "17" at 31.336,19.26 h1.2 r90
  text "15" at 10.654,18.032 h1.2 r270
  text "16" at 10.654,15.246 h1.2 r270
  text "o" at 35.1,14.3 h10 r90
  text "VSCPU Development /       Board" at 46.9,12.5 h1.2 r90
Bottom Overlay:
  lines w0.37: 18.205,73.871 18.346,73.446 ; 18.771,73.305 18.346,73.446 ; 19.054,74.154 18.346,73.446
  text "3V3" at 23.246,88.279 h1.2
  text "IO16" at 23.246,86.161 h1.2
  text "IO17" at 23.616,84.154 h1.2
  text "IO30" at 23.246,81.926 h1.2
  text "IO29" at 23.146,79.646 h1.2
  text "IO28" at 23.146,77.854 h1.2
  text "IO27" at 23.246,75.572 h1.2
  text "GND" at 23.246,73.454 h1.2
  text "Designed by  / Ebubekir Tasci" at 10.1,36.7 h1.2 r270
  text "GND" at 30.319,24.754 h1.2
  text "5V" at 29.72,16.754 h1.2
Mechanical 1:
  circle w0.01: c32.4,23.48 r0.25
  circle w0.01: c32.4,24.63 r0.25
  circle w0.01: c32.4,25.78 r0.25
  circle w0.01: c32.4,28.08 r0.25
  circle w0.01: c32.4,26.93 r0.25
  circle w0.01: c32.4,68.65 r0.25
  circle w0.01: c32.4,69.8 r0.25
  circle w0.01: c32.4,67.5 r0.25
  circle w0.01: c32.4,66.35 r0.25
  circle w0.01: c32.4,65.2 r0.25
  circle w0.01: c32.4,79.02 r0.25
  circle w0.01: c32.4,80.17 r0.25
  circle w0.01: c32.4,81.32 r0.25
  circle w0.01: c32.4,83.62 r0.25
  circle w0.01: c32.4,82.47 r0.25
  lines w0.01: 32.394,21.691 32.394,22.791 cw(c32.594,22.791) 32.594,22.991 32.994,22.991 cw(c32.994,22.791) 33.194,22.791 33.194,21.691 ; 32.4,86 32.4,84.3 ccw(c32.6,84.3) 32.6,84.1 33,84.1 ccw(c33,84.3) 33.2,84.3 33.2,86 ; 32.399,28.731 ccw(c32.599,28.731) 32.599,28.531 33.003,28.531 ccw(c33.003,28.731) 33.203,28.731 33.203,64.622 ccw(c33.003,64.622) 33.003,64.822 32.599,64.822 ccw(c32.599,64.622) 32.399,64.622 32.399,28.731 ; 32.4,70.4 ccw(c32.6,70.4) 32.6,70.2 33.004,70.2 ccw(c33.004,70.4) 33.204,70.4 33.204,78.384 ccw(c33.004,78.384) 33.004,78.584 32.6,78.584 ccw(c32.6,78.384) 32.4,78.384 32.4,70.4

## Text inside footprints (layer, text, board x,y; h text height)
SW2: Top Overlay "ON" at 20.8,85.6 h1.2 r90; Top Component Outline "2" at 24.6,87.4 h1.2 r90; Top Component Outline "ON" at 20,84.43 h1.2 r90; Top Component Outline "1" at 24.6,85 h1.2 r90